# Altium PCB MainPCB.PcbDoc (part 3 of 3)
Units mm, origin at the board's own origin, x right, y up, seen from the top; angles counter-clockwise.
Board outline 200.18 x 193.98 mm, 4 copper layers (Top Layer, PWR, GND, Bottom Layer), stack 1.566 mm thick; 92 components, 81 nets, 391 pads, 267 vias.
Unrouted connection lines stored in the file: 114.
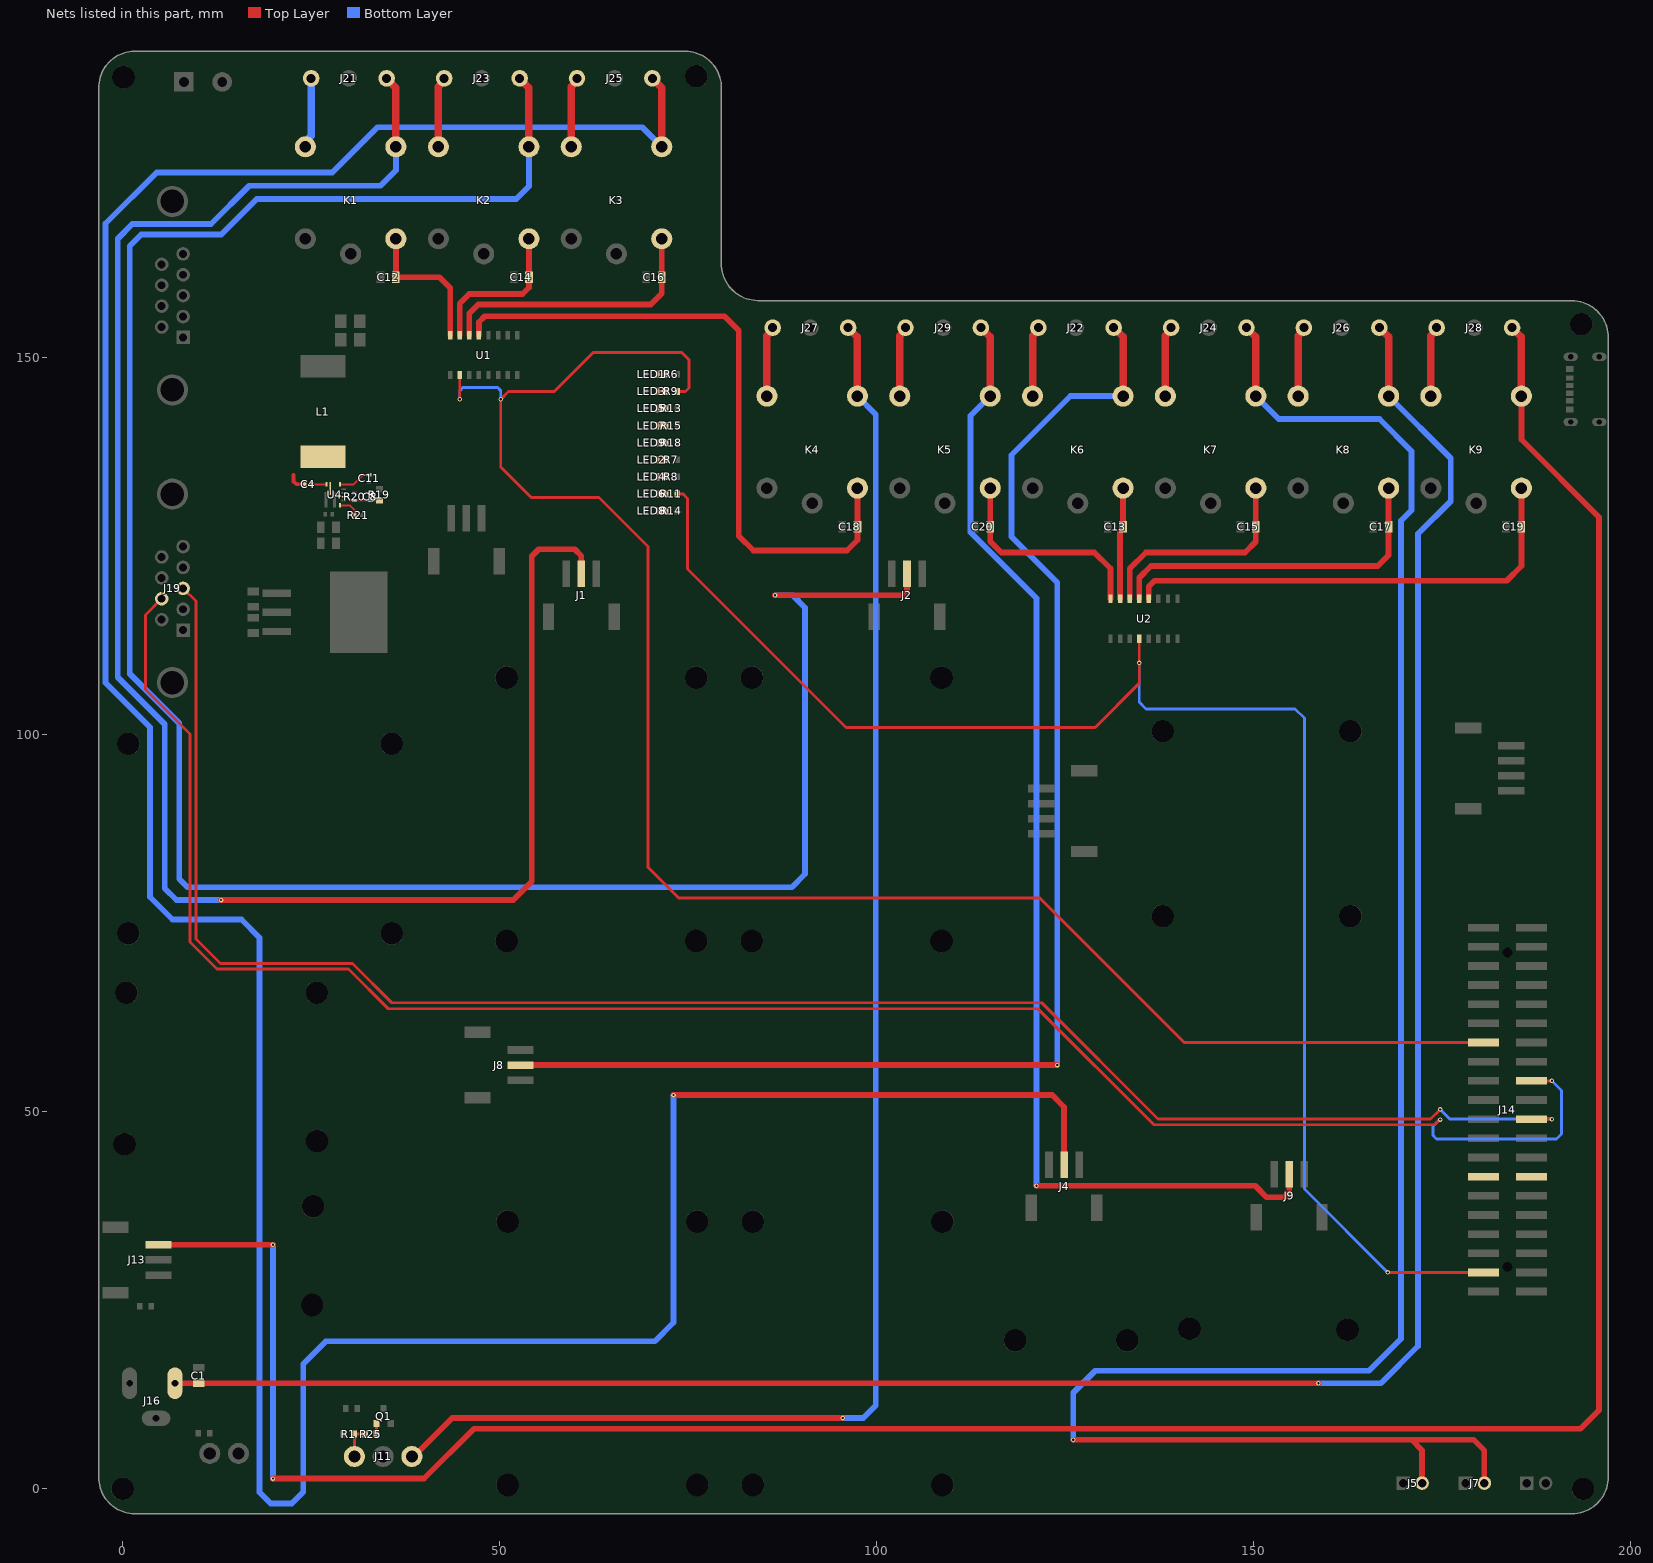
[diagram p4: the nets of this part, all layers, seen from the top]

## Via types
v1: diameter 0.6, hole 0.3, Top Layer to Bottom Layer, 267 vias

## Nets (pads, with @x,y where several pads share a name; then routed paths per layer and width w, separated by ;. In a path a pad name is that pad's centre, name@x,y a point inside that pad or via, vN(x,y) a via of type N, cw(c..) or ccw(c..) an arc to the next point about the centre after c; other vN are vias at no path point) (continued)
GPIO24: J14.18 J19.7 | length 255.3
  Top Layer w0.381: J19.7@5.184,118.027 5.156,118.027 3.023,115.893 3.023,106.007 8.948,100.081 8.948,72.508 12.524,68.933 29.968,68.933 35.23,63.671 121.357,63.671 136.751,48.276 173.972,48.276 174.667,48.971 v1(174.727,48.971) ; J14.18@186.842,54.102 v1(189.535,54.102)
  Bottom Layer w0.381: v1(174.727,48.971) 174.667,48.971 174.134,48.438 174.117,48.438 173.759,48.08 173.759,46.88 174.236,46.402 190.159,46.402 190.805,47.049 190.805,52.832 v1(189.535,54.102)
GPIO25: J14.22 J19.3 | length 240.7
  Top Layer w0.381: J19.3@8.024,119.412 9.722,117.714 9.722,72.926 12.972,69.676 30.48,69.676 35.697,64.459 121.889,64.459 137.315,49.032 173.442,49.032 v1(174.727,50.317) ; J14.22@186.842,49.022 v1(189.535,49.022)
  Bottom Layer w0.381: v1(174.727,50.317) 176.022,49.022 v1(189.535,49.022)
GPIO26: J14.37 R11.2 U2.4 | length 206.7
  Top Layer w0.381: R11.2@73.533,131.944 74.304,131.944 74.924,131.324 74.924,121.976 95.924,100.977 128.968,100.977 134.81,106.82 v1(134.81,109.526) U2.4@134.81,112.754 ; v1(167.767,28.702) J14.37@180.442,28.702
  Bottom Layer w0.381: v1(134.81,109.526) 134.81,104.331 135.712,103.429 155.476,103.429 156.706,102.199 156.706,39.763 v1(167.767,28.702)
GPIO27: J14.13 R9.2 U1.2 | length 240.5
  Top Layer w0.381: v1(44.708,144.475) U1.2@44.708,147.703 ; R9.2@73.533,145.525 74.63,145.525 75.09,145.986 75.09,149.725 74.143,150.673 62.412,150.673 57.247,145.508 51.17,145.508 v1(50.14,144.477) 50.14,135.518 54.197,131.461 63.173,131.461 69.661,124.972 69.661,82.427 73.745,78.343 121.61,78.343 140.771,59.182 J14.13@180.442,59.182
  Bottom Layer w0.381: v1(44.708,144.475) 44.708,145.622 45.11,146.025 49.735,146.025 49.737,146.027 50.14,145.624 v1(50.14,144.477)
ID_SC: J14.28
ID_SD: J14.27
NC1: J21.1 K1.3 | length 9.6
  Bottom Layer w1: K1.3@23.767,177.964 23.767,178.179 25.003,179.415 J21.1@25.003,187.038
NC2: J23.1 K2.3 | length 9.4
  Top Layer w1: K2.3@41.883,177.964 41.883,185.95 42.646,186.713 J23.1@42.646,187.038
NC3: J25.1 K3.3 | length 9.6
  Top Layer w1: K3.3@59.019,177.964 59.019,178.319 59.492,178.792 59.492,185.95 60.255,186.713 J25.1@60.255,187.038
NC4: J27.1 K4.3 | length 9.4
  Top Layer w1: K4.3@85.444,144.901 85.444,152.888 86.207,153.651 J27.1@86.207,153.976
NC5: J29.1 K5.3 | length 9.3
  Top Layer w1: K5.3@103.052,144.956 103.052,152.888 103.815,153.651 J29.1@103.815,153.976
NC6: J22.1 K6.3 | length 9.3
  Top Layer w1: K6.3@120.66,144.956 120.66,152.888 121.423,153.651 J22.1@121.423,153.976
NC7: J24.1 K7.3 | length 9.3
  Top Layer w1: K7.3@138.268,144.956 138.268,152.888 139.031,153.651 J24.1@139.031,153.976
NC8: J26.1 K8.3 | length 9.3
  Top Layer w1: K8.3@155.877,144.956 155.877,152.888 156.64,153.651 J26.1@156.64,153.976
NC9: J28.1 K9.3 | length 9.3
  Top Layer w1: K9.3@173.485,144.956 173.485,152.888 174.248,153.651 J28.1@174.248,153.976
NetC4_1: C4.1 U4.7 | length 1.9
  Top Layer w0.254: C4.1@25.086,133.209 U4.7@26.961,133.209
NetC4_2: C4.2 L1.1 U4.6 | length 2.5
  Top Layer w0.508: 22.656,134.442 22.656,133.593 23.04,133.209 C4.2@24.146,133.209
NetC8_1: C8.1 R19.1 R20.2 U4.2 | length 5
  Top Layer w0.254: U4.2@29.303,131.559 29.723,131.559 30.213,131.069 30.753,131.069 R20.2@30.763,131.059 R19.1@34.081,131.059
NetC11_2: C11.2 U4.5 | length 4.4
  Top Layer w0.254: U4.5@28.833,133.209 30.647,133.209 31.899,134.461 C11.2@32.715,134.461
NetJ11_1: J11.1 R1.1 R25.1 | length 4.4
  Top Layer w0.381: J11.1@30.734,4.293 R1.1@30.734,7.264 R25.1@32.134,7.264
NetLED1_1: LED1.1 R6.1 | length 1.1
  Top Layer w0.381: LED1.1@70.918,147.789 R6.1@72.009,147.789
NetLED2_1: LED2.1 R7.1 | length 1.1
  Top Layer w0.381: LED2.1@70.918,136.471 R7.1@72.009,136.471
NetLED3_1: LED3.1 R9.1 | length 1.1
  Top Layer w0.381: LED3.1@70.918,145.525 R9.1@72.009,145.525
NetLED4_1: LED4.1 R8.1 | length 1.1
  Top Layer w0.381: LED4.1@70.918,134.208 R8.1@72.009,134.208
NetLED5_1: LED5.1 R13.1 | length 1.1
  Top Layer w0.381: LED5.1@70.918,143.262 R13.1@72.009,143.262
NetLED6_1: LED6.1 R11.1 | length 1.1
  Top Layer w0.381: LED6.1@70.918,131.944 R11.1@72.009,131.944
NetLED7_1: LED7.1 R15.1 | length 1.1
  Top Layer w0.381: LED7.1@70.918,140.998 R15.1@72.009,140.998
NetLED8_1: LED8.1 R14.1 | length 1.1
  Top Layer w0.381: LED8.1@70.918,129.681 R14.1@72.009,129.681
NetLED9_1: LED9.1 R18.1 | length 1.1
  Top Layer w0.381: LED9.1@70.918,138.735 R18.1@72.009,138.735
NetQ1_1: Q1.1 R25.2 | length 1.4
  Top Layer w0.381: R25.2@33.658,7.264 Q1.1@33.658,8.661
NetR21_2: R21.2 U4.10 | length 2.9
  Top Layer w0.254: U4.10@28.833,130.409 30.14,130.409 30.763,129.786 R21.2@30.763,129.102
NO1: J1.2 J21.3 K1.2 | length 245.2
  Top Layer w0.762: v1(13.056,78.08) 51.809,78.08 54.254,80.525 54.254,109.069 54.254,123.664 55.188,124.598 59.951,124.598 60.833,123.716 J1.2@60.833,121.341
  Top Layer w1: J21.3@35.003,187.038 36.239,185.802 K1.2@36.239,177.964
  Bottom Layer w0.762: v1(13.056,78.08) 7.137,78.08 5.588,79.629 5.588,101.377 -0.65,107.615 -0.65,165.768 1.291,167.71 11.717,167.71 16.8,172.793 34.179,172.793 36.239,174.853 K1.2@36.239,177.964
NO2: J2.2 J23.3 K2.2 | length 301.9
  Top Layer w0.762: v1(86.512,118.491) 103.48,118.491 104.013,119.024 J2.2@104.013,121.341
  Top Layer w1: J23.3@52.646,187.038 53.882,185.802 K2.2@53.882,177.964
  Bottom Layer w0.762: K2.2@53.882,177.964 53.882,172.727 52.199,171.044 17.79,171.044 13.089,166.343 2.466,166.343 0.939,164.817 0.939,108.098 7.518,101.518 7.518,80.874 8.611,79.781 88.756,79.781 90.5,81.525 90.5,116.852 88.861,118.491 v1(86.512,118.491)
NO3: J4.2 J25.3 K3.2 | length 437.4
  Top Layer w0.762: v1(73.05,52.222) 123.266,52.222 124.841,50.648 J4.2@124.841,42.982
  Top Layer w1: J25.3@70.255,187.038 71.491,185.802 K3.2@71.491,177.964
  Bottom Layer w0.762: K3.2@71.491,177.964 68.897,180.558 33.81,180.558 27.808,174.555 4.52,174.555 -2.259,167.776 -2.259,106.894 3.638,100.998 3.638,78.481 6.63,75.489 15.762,75.489 18.161,73.09 18.161,-0.457 19.634,-1.93 22.43,-1.93 23.952,-0.409 23.952,16.561 26.949,19.558 70.561,19.558 73.05,22.047 v1(73.05,52.222)
NO4: J11.3 J27.3 K4.2 | length 208.8
  Top Layer w0.762: J11.3@38.354,4.293 38.603,4.293 43.708,9.398 v1(95.479,9.398)
  Top Layer w1: J27.3@96.207,153.976 97.443,152.74 K4.2@97.443,144.901
  Bottom Layer w0.762: v1(95.479,9.398) 98.218,9.398 99.873,11.053 99.873,142.471 K4.2@97.443,144.901
NO5: J9.2 J29.3 K5.2 | length 155.8
  Top Layer w0.762: v1(121.183,40.183) 150.193,40.183 151.702,38.674 154.038,38.674 154.686,39.322 J9.2@154.686,41.712
  Top Layer w1: J29.3@113.815,153.976 115.051,152.74 K5.2@115.051,144.901
  Bottom Layer w0.762: K5.2@115.051,144.901 112.435,142.286 112.435,126.857 121.183,118.109 v1(121.183,40.183)
NO6: J8.2 J22.3 K6.2 | length 182.2
  Top Layer w0.762: J8.2@52.761,56.197 v1(123.952,56.197)
  Top Layer w1: J22.3@131.423,153.976 132.659,152.74 K6.2@132.659,144.901
  Bottom Layer w0.762: v1(123.952,56.197) 123.952,120.167 117.856,126.263 117.856,137.077 125.681,144.902 K6.2@132.659,144.901
NO7: J5.2 J7.2 J24.3 K7.2 | length 270
  Top Layer w0.762: v1(126.06,6.528) 170.904,6.528 ; J5.2@172.319,0.762 172.319,5.113 170.904,6.528 ; J7.2@180.574,0.762 180.574,5.091 179.137,6.528 170.904,6.528
  Top Layer w1: J24.3@149.031,153.976 150.267,152.74 K7.2@150.267,144.901
  Bottom Layer w0.762: v1(126.06,6.528) 126.06,12.751 128.981,15.672 165.278,15.672 169.525,19.919 169.525,128.378 170.917,129.769 170.917,137.6 166.658,141.859 153.31,141.859 K7.2@150.267,144.901
NO8: C1.2 J16.1 J26.3 K8.2 | length 307.6
  Top Layer w0.762: J16.1@6.936,14.009 C1.2@10.084,14.009 ; C1.2@10.09,14.015 v1(158.566,14.015)
  Top Layer w1: J26.3@166.64,153.976 167.876,152.74 K8.2@167.876,144.901
  Bottom Layer w0.762: v1(158.566,14.015) 166.868,14.015 171.78,18.927 171.78,126.644 176.108,130.972 176.108,136.669 K8.2@167.876,144.901
NO9: J13.1 J28.3 K9.2 | length 374.1
  Top Layer w0.508: J13.1@4.755,32.353 J13.1@4.758,32.356
  Top Layer w0.762: J13.1@4.758,32.356 19.928,32.356 v1(19.931,32.36) ; v1(19.931,1.372) 39.98,1.372 46.58,7.972 193.316,7.972 195.78,10.436 195.78,128.836 185.484,139.133 K9.2@185.484,144.901
  Top Layer w1: J28.3@184.248,153.976 185.484,152.74 K9.2@185.484,144.901
  Bottom Layer w0.762: v1(19.931,1.372) v1(19.931,32.36)
"RELAY 1": C12.1 K1.1 U1.16 | length 19.1
  Top Layer w0.762: K1.1@36.239,165.764 C12.1@36.239,160.655 42.011,160.655 43.438,159.228 U1.16@43.438,152.983
"RELAY 2": C14.1 K2.1 U1.15 | length 20.7
  Top Layer w0.762: U1.15@44.708,152.983 44.708,157.179 45.968,158.44 53.035,158.44 53.883,159.287 C14.1@53.883,160.655 K2.1@53.883,165.764
"RELAY 3": C16.1 K3.1 U1.14 | length 36.7
  Top Layer w0.762: U1.14@45.978,152.983 45.978,155.855 47.172,157.05 70.03,157.05 71.491,158.511 C16.1@71.491,160.655 K3.1@71.491,165.764
"RELAY 4": C18.1 K4.1 U1.13 | length 88.5
  Top Layer w0.762: U1.13@47.248,152.983 47.248,154.715 48.031,155.499 79.809,155.499 81.716,153.592 81.716,126.361 83.642,124.435 96.063,124.435 97.443,125.815 C18.1@97.443,127.584 K4.1@97.443,132.701
"RELAY 5": C20.1 K5.1 U2.16 | length 28.5
  Top Layer w0.762: K5.1@115.051,132.701 C20.1@115.051,127.584 115.051,125.639 116.51,124.181 128.854,124.181 131,122.034 U2.16@131,118.034
"RELAY 6": C13.1 K6.1 U2.15 | length 14.8
  Top Layer w0.762: U2.15@132.27,118.034 132.27,126.941 132.66,127.33 C13.1@132.66,127.584 K6.1@132.66,132.701
"RELAY 7": C15.1 K7.1 U2.14 | length 29.3
  Top Layer w0.762: U2.14@133.541,118.034 133.541,122.034 135.687,124.181 148.844,124.181 150.268,125.604 C15.1@150.268,127.584 K7.1@150.268,132.701
"RELAY 8": C17.1 K8.1 U2.13 | length 46
  Top Layer w0.762: U2.13@134.81,118.034 134.81,120.817 136.37,122.377 166.446,122.377 167.876,123.807 C17.1@167.876,127.584 K8.1@167.876,132.701
"RELAY 9": C19.1 K9.1 U2.12 | length 62.5
  Top Layer w0.762: U2.12@136.081,118.034 136.081,119.672 136.83,120.421 183.535,120.421 185.484,122.371 C19.1@185.484,127.584 K9.1@185.484,132.701
pads on no net: J10.A5 J10.B5 J14. U1.5 U1.6 U1.7 U1.10 U1.11 U1.12 U2.6 U2.7 U2.10 U2.11 U4.1 U4.4

## Polygon pours and split planes (outlines as drawn)
GND on Top Layer "NONET_L-01_P-001" (solid, remove dead copper, pour order 12): -3.175,1.629 -3.175,185.698 cw(c1.703,185.774) 1.627,190.652 74.598,190.652 cw(c74.522,185.774) 79.4,185.698 79.4,162.53 ccw(c84.278,162.454) 84.202,157.576 192.198,157.576 cw(c192.122,152.698) 197,152.622 197,1.629 cw(c192.122,1.553) 192.198,-3.325 1.627,-3.325 cw(c1.703,1.553)
+24V on Top Layer "NONET_L-01_P-001" (solid, pour order 1): 10.033,164.338 9.093,165.278 -2.921,165.278 -2.921,185.572 cw(c1.93,185.573) 1.93,190.424 10.871,190.424 10.871,176.733 17.856,169.748 17.856,136.398 21.82,132.434 24.146,132.434 27.15,132.434 27.15,123.289 22.343,123.289 22.343,118.275 12.929,118.275 12.929,123.8 10.033,126.695
5V_EX on Top Layer "NONET_L-01_P-001" (solid, pour order 6): 29.667,145.39 19.634,145.39 19.634,175.362 29.667,175.362
GND on Top Layer "NONET_L-01_P-001" (solid, pour order 5): 33.033,132.715 32.233,132.715 32.233,131.571 30.208,131.571 29.845,131.934 29.003,131.934 29.003,132.27 30.253,132.27 31.752,133.769 33.033,133.769
NetC4_2 on Top Layer "NONET_L-01_P-001" (solid, pour order 4): 28.313,132.41 27.746,132.41 27.746,131.809 27.305,131.809 27.305,133.612 27.055,133.862 22.12,133.862 19.914,136.068 19.914,142.857 30.734,142.857 30.734,136.119 28.313,133.697
GND on Top Layer "NONET_L-01_P-001" (solid, pour order 3): 28.313,132.209 27.915,132.209 27.915,131.571 27.33,130.987 27.33,123.289 36.853,123.289 36.853,128.473 30.524,128.473 30.213,128.784 30.213,129.668 30.095,129.786 28.636,129.786 28.313,130.109
3V3 on PWR "NONET_L-01_P-001" (solid, pour order 11): -3.175,77.622 -3.175,-3.325 184.912,-3.325 184.912,77.622
5V_EX on PWR "NONET_L-01_P-001" (solid, pour order 8): 196.545,1.769 196.545,-3.325 185.598,-3.325 185.598,78.207 -2.787,78.207 -2.787,119.761 6.338,119.761 6.338,107.569 163.83,107.569 163.83,117.983 27.61,117.983 27.61,145.085 22.022,145.085 22.022,190.263 74.054,190.263 75.308,190.263 cw(c73.84,185.429) 78.892,185.428 78.892,161.747 ccw(c83.312,161.747) 83.312,157.328 191.653,157.328 cw(c191.882,152.664) 196.545,152.892 196.545,152.436
12V on PWR "NONET_L-01_P-001" (solid, pour order 2): 27.026,119.761 27.026,117.422 163.119,117.422 163.119,108.306 6.655,108.306 6.655,119.761
+24V on PWR "NONET_L-01_P-001" (solid, pour order 0): 21.438,144.348 27.026,144.348 27.026,120.066 -2.921,120.066 -2.921,185.572 cw(c1.93,185.573) 1.93,190.424 21.438,190.424
GND on Bottom Layer "NONET_L-01_P-001" (solid, remove dead copper, pour order 13): -3.175,1.629 -3.175,185.698 cw(c1.703,185.774) 1.627,190.652 74.598,190.652 cw(c74.522,185.774) 79.4,185.698 79.4,162.53 ccw(c84.278,162.454) 84.202,157.576 192.198,157.576 cw(c192.122,152.698) 197,152.622 197,1.629 cw(c192.122,1.553) 192.198,-3.325 1.627,-3.325 cw(c1.703,1.553)
5V_EX on Bottom Layer "NONET_L-01_P-001" (solid, pour order 10): 18.009,169.088 18.009,165.43 2.134,165.43 2.134,148.234 27.813,148.234 27.813,159.537 52.705,159.537 52.705,151.257 62.763,151.257 62.763,127.991 95.428,127.991 95.428,142.824 72.415,142.824 72.415,160.528 72.39,160.553 61.316,160.553 61.316,169.088
12V on Bottom Layer "NONET_L-01_P-001" (solid, pour order 9): 141.326,140.36 141.326,111.379 164.607,111.379 164.607,140.36
GND on GND "NONET_L-01_P-001" (solid, pour order 14): -3.175,1.629 -3.175,185.698 cw(c1.703,185.774) 1.627,190.652 74.598,190.652 cw(c74.522,185.774) 79.4,185.698 79.4,162.53 ccw(c84.278,162.454) 84.202,157.576 192.198,157.576 cw(c192.122,152.698) 197,152.622 197,1.629 cw(c192.122,1.553) 192.198,-3.325 1.627,-3.325 cw(c1.703,1.553)

## Other copper
Top Layer:
  rectangle net 5V_EX: 28.205,189.052 50.038,190.263
  rectangle net 5V_EX: 187.909,143.914 191.16,147.648
  rectangle net 5V_EX: 187.909,143.914 196.774,144.648
  rectangle net 5V_EX: 192.634,143.914 196.774,147.648
  rectangle net 5V_EX: 187.909,146.948 196.774,147.648
  rectangle net 5V_EX: 187.3,143.914 190.703,157.328
  rectangle net 5V_EX: 89.409,155.499 190.703,157.328
  rectangle net 5V_EX: 83.63,134.647 104.724,142.816
  rectangle net 5V_EX: 118.847,134.647 139.941,142.816
  rectangle net 3V3: 183.032,53.592 184.125,63.752
  rectangle net 3V3: 178.392,53.592 184.125,54.612
  rectangle net 3V3: 177.597,73.838 182.608,76.073
  rectangle net 12V: 142.265,135.238 164.033,142.816
  rectangle net 5V_EX: 19.634,167.716 61.164,175.388
  rectangle net 5V_EX: 28.205,159.893 34.715,161.417
  rectangle net 5V_EX: 22.437,163.805 32.394,167.716
  rectangle net 5V_EX: 40.081,163.805 50.038,172.568
  rectangle net 5V_EX: 45.849,159.893 52.359,161.417
  rectangle net 5V_EX: 57.69,159.884 61.164,172.568
  rectangle net 5V_EX: 57.69,159.884 69.967,161.408
  rectangle net 5V_EX: 171.683,126.822 175.157,134.391
  rectangle net 5V_EX: 171.683,126.822 183.96,128.346
  rectangle net 5V_EX: 154.075,126.822 157.549,134.391
  rectangle net 5V_EX: 154.075,126.822 166.352,128.346
  rectangle net 5V_EX: 136.467,126.822 139.941,142.816
  rectangle net 5V_EX: 136.467,126.822 148.744,128.346
  rectangle net 5V_EX: 101.25,126.822 113.527,128.346
  rectangle net 5V_EX: 101.25,126.822 104.724,142.816
  rectangle net 5V_EX: 118.859,126.822 131.136,129.083
  rectangle net 5V_EX: 118.847,126.822 128.815,142.816
  rectangle net 5V_EX: 83.63,126.822 93.599,142.816
  rectangle net 5V_EX: 83.642,126.822 95.919,129.083
  rectangle net 5V_EX: 52.038,152.261 53.96,154.129
  rectangle net GND: 52.038,147.013 53.96,148.849
  rectangle net 5V_EX: 139.601,117.474 141.859,119.64
  rectangle net GND: 139.601,110.947 141.859,113.314
  rectangle net 5V: 83.826,81.509 188.892,83.363
  region net 12V: 19.688,109.017 19.688,114.185 16.57,114.185 16.57,109.017
  region net 12V: 22.343,111.709 22.343,114.185 16.57,114.185 16.57,111.709
  rectangle net 5V_EX: 28.205,159.893 32.396,190.263
  rectangle net 5V_EX: 45.849,159.893 50.038,190.263
  rectangle net 3V3: 63.457,162.367 67.648,189.094
  rectangle net 5V_EX: 89.409,126.822 93.6,157.328
  rectangle net 3V3: 107.018,129.304 111.208,155.05
  rectangle net 5V_EX: 124.626,129.304 128.816,157.328
  rectangle net 12V: 142.234,129.304 146.424,155.032
  rectangle net 3V3: 177.45,129.304 181.641,155.076
  rectangle net 12V: 159.842,129.304 164.033,155.037
  rectangle net 5V: 184.792,71.372 188.892,83.363
  pour cut-out: 42.926,152.245 51.534,152.245 51.534,154.181 42.926,154.181
  pour cut-out: 21.895,175.595 21.895,180.162 27.102,180.162 27.102,175.595
  pour cut-out: 22.987,185.085 22.987,189.059 27.076,189.059 27.076,185.085
  pour cut-out: 96.138,8.338 90.907,8.338 90.907,10.273 96.138,10.273
  pour cut-out: 51.706,8.009 43.251,8.009 43.251,10.414 51.706,10.414
  pour cut-out: 159.207,12.389 153.588,12.389 153.588,14.656 159.207,14.656
  pour cut-out: 17.852,11.69 11.049,11.69 11.049,14.281 17.852,14.281
  pour cut-out: 176.316,53.442 176.316,62.116 178.251,62.116 178.251,53.442
  pour cut-out: 46.807,144.819 52.038,144.819 52.038,142.884 46.807,142.884
  pour cut-out: 42.926,148.44 51.534,148.44 51.534,146.505 42.926,146.505
  pour cut-out: 130.353,119.206 139.393,119.206 139.393,117.271 130.353,117.271
  pour cut-out: 130.507,111.582 139.116,111.581 139.116,113.517 130.507,113.517
  pour cut-out: 57.247,154.851 57.247,147.294 59.182,147.294 59.182,154.851
  pour cut-out: 74.117,148.848 70.465,148.848 70.465,128.978 74.117,128.978
  pour cut-out: 82.652,124.454 82.652,119.818 83.591,119.818 83.591,124.454
  pour cut-out: 60.884,154.864 60.884,153.34 81.068,153.34 81.068,154.864
  pour cut-out: 27.102,175.595 28.194,175.595 28.194,190.424 27.102,190.424
  pour cut-out: 28.029,190.424 28.029,189.059 32.396,189.059 32.396,190.424
  pour cut-out: 29.888,149.728 29.888,145.39 34.425,145.39 34.425,149.728
  pour cut-out: 17.856,145.39 17.856,142.857 34.747,142.857 34.747,145.39
  pour cut-out: 19.634,175.595 17.856,175.595 17.856,145.39 19.634,145.39
  pour cut-out: 29.007,134.239 29.007,133.737 29.235,133.509 30.387,133.509 31.786,134.908 34.747,134.908 34.747,142.857 30.886,142.857 30.886,136.135 29.003,134.252
  pour cut-out: 29.003,131.809 29.97,131.809 30.25,131.529 32.248,131.529 33.173,132.454 33.173,134.908 34.747,134.908 34.747,129.896 29.003,129.896
  pour cut-out: 28.626,133.509 28.626,130.109 29.003,130.109 29.003,133.509
PWR:
  rectangle net 5V: 81.885,78.207 90.856,83.947
  rectangle net 5V: 85.598,59.334 90.856,83.947
  pour cut-out: 37.407,122.562 27.61,122.562 27.61,123.781 37.407,123.781
  pour cut-out: 37.407,124.308 29.088,124.308 29.088,125.527 37.407,125.527
  pour cut-out: 37.407,126.054 29.088,126.054 29.088,127.273 37.407,127.273
  pour cut-out: 38.43,147.523 33.854,147.523 33.854,148.742 38.43,148.742
  pour cut-out: 38.43,149.962 32.33,149.962 32.33,151.181 38.43,151.181
  pour cut-out: 38.43,152.4 32.33,152.4 32.33,153.619 38.43,153.619
  pour cut-out: 38.43,154.838 32.33,154.838 32.33,156.058 38.43,156.058
  pour cut-out: 38.43,157.277 30.806,157.277 30.806,158.496 38.43,158.496
GND:
  pour cut-out: 9.682,183.159 3.177,183.159 3.177,190.259 9.682,190.259
  pour cut-out: 25.73,129.875 11.542,129.875 11.542,132.361 25.73,132.361
  pour cut-out: 162.941,112.243 143.023,112.243 143.023,113.462 162.941,113.462
  pour cut-out: 190.195,143.707 190.195,147.852 193.548,147.852 193.548,143.707
Bottom Layer:
  rectangle net +24V: 11.963,129.875 25.756,132.385
  rectangle net 5V_EX: 28.194,188.697 50.028,190.17
  rectangle net 5V_EX: 45.838,181.432 50.028,190.17
  rectangle net 5V_EX: 28.194,181.432 50.028,185.268
  rectangle net 5V_EX: 28.194,181.432 32.385,190.17
  rectangle net 5V_EX: 124.624,152.908 128.282,157.328
  rectangle net 5V_EX: 119.246,128.194 129.539,135.953
  rectangle net 5V: 85.598,59.334 90.856,61.9
  rectangle net 5V_EX: 187.503,142.951 194.716,148.901
  rectangle net 5V_EX: 185.91,146.939 190.271,157.328
  rectangle net 5V_EX: 187.503,142.951 190.304,157.328
  rectangle net 5V_EX: 89.408,155.493 190.304,157.328
  rectangle net 5V_EX: 89.408,152.908 93.066,157.328
  rectangle net 5V_EX: 136.271,129.667 140.233,140.36
  rectangle net 5V_EX: 125.093,136.042 140.233,140.36
  rectangle net 5V_EX: 125.093,128.194 129.539,140.36
  rectangle net 3V3: 177.6,61.087 184.374,64.919
  rectangle net 3V3: 177.6,61.087 182.608,155.092
  rectangle net 3V3: 106.425,128.956 110.921,155.076
  rectangle net 3V3: 73.609,147.041 182.601,152.298
  rectangle net 3V3: 62.865,181.534 78.892,185.445
  rectangle net 3V3: 62.865,181.534 67.361,190.144
  rectangle net 3V3: 73.609,147.879 78.892,185.445
  rectangle net 3V3: 62.332,168.732 78.892,175.743
  rectangle net 3V3: 62.332,161.925 68.682,175.743
  rectangle net 12V: 158.883,128.019 164.607,140.36
  rectangle net 12V: 141.326,128.019 147.216,140.36
  rectangle net 12V: 12.223,108.46 19.932,111.044
  rectangle net 12V: 12.076,108.46 14.974,117.964
  rectangle net 12V: 6.985,115.291 14.974,117.964
  rectangle net 5V: 9.55,81.509 86.462,83.333
  rectangle net 5V: 9.55,81.509 11.568,114.833
  rectangle net 5V: 6.997,110.642 11.568,114.833
  pour cut-out: 13.716,79.159 13.716,75.12 12.929,75.12 12.929,79.159
  pour cut-out: 2.007,163.174 2.007,163.855 7.954,169.803 11.989,169.803 21.971,169.803 21.971,176.276 -2.718,176.276 -2.718,163.174
  pour cut-out: 21.971,169.803 21.971,179.857 62.211,179.857 62.211,169.803
  pour cut-out: 182.815,142.76 187.274,142.76 187.274,145.52 182.815,145.52
  pour cut-out: 129.567,128.245 141.118,128.245 141.118,134.163 129.567,134.163
  pour cut-out: 111.128,128.194 119.039,128.194 119.039,146.71 111.128,146.71
  pour cut-out: 164.846,127.965 177.444,127.965 177.444,133.883 164.846,133.883
  pour cut-out: 95.605,127.965 106.218,127.965 106.218,133.883 95.605,133.883
  pour cut-out: 2.007,176.327 -2.718,176.327 -2.718,106.718 2.007,106.718
  pour cut-out: 72.612,143.031 72.612,146.761 79.28,146.761 79.28,143.031
  pour cut-out: 21.996,176.111 21.996,190.291 22.826,190.291 22.826,176.111

## Silkscreen, mask and mechanical layers (free items; w line width, h text height)
Top Overlay:
  lines w0.127: 31.169,130.741 31.169,130.367 31.524,130.012 34.162,130.012 34.162,129.533 ; 32.944,130.544 32.944,130.309 34.931,130.309 35.636,129.604 ; 34.081,129.761 33.934,129.761 34.162,129.533 ; 34.242,129.761 34.389,129.761 34.162,129.533 ; 35.475,129.761 35.318,129.604 35.636,129.604 ; 35.48,129.766 35.636,129.922 35.636,129.604
  lines w0.254: -2.839,70.233 -2.839,102.233 39.161,102.233 39.161,70.233 -2.839,70.233 ; -2.794,20.894 -2.794,40.894 35.206,40.894 35.206,20.894 -2.794,20.894 ; -2.794,42.164 29.21,42.164 29.21,69.215 -2.794,69.215 -2.794,42.164 ; 47.5,69.043 47.5,111.043 79.5,111.043 79.5,69.043 47.5,69.043 ; 47.627,-3.093 47.627,38.907 79.627,38.907 79.627,-3.093 47.627,-3.093 ; 80.012,69.043 80.012,111.043 112.012,111.043 112.012,69.043 80.012,69.043 ; 80.139,-3.093 80.139,38.907 112.139,38.907 112.139,-3.093 80.139,-3.093 ; 114.73,-3.03 114.73,30.97 136.73,30.97 136.73,-3.03 114.73,-3.03 ; 134.368,72.265 134.368,104.265 166.368,104.265 166.368,72.265 134.368,72.265 ; 137.892,-3.205 137.892,24.795 165.892,24.795 165.892,-3.205 137.892,-3.205
  text "+24V" at 6.295,180.907 h1
  text "GND" at 11.875,180.907 h1
  text "RELAY 1" at 62.86,147.128 h1.4
  text "RELAY 2" at 62.86,144.865 h1.4
  text "RELAY 3" at 62.86,142.601 h1.4
  text "USB" at 190.329,140.698 h1.5 r90
  text "RELAY 4" at 62.86,140.338 h1.4
  text "RELAY 5" at 62.86,138.074 h1.4
  text "RELAY 6" at 62.86,135.811 h1.4
  text "RELAY 7" at 62.86,133.547 h1.4
  text "RELAY 8" at 62.86,131.284 h1.4
  text "EXTRA SENSOR" at 40.493,131.032 h1.5
  text "RELAY 9" at 62.86,129.02 h1.4
  text "ISOLATOR" at 55.733,123.463 h1.5
  text "ISOLATOR" at 98.913,123.463 h1.5
  text "MAIN" at 196.139,114.452 h3 r90
  text "ISOLATOR" at 55.882,106.299 h2.03
  text "ISOLATOR" at 88.394,106.172 h2.03
  text "I2C" at 186.658,100.652 h1.5 r270
  text "ADS1115" at 144.105,98.933 h2.03
  text "Extra Sensor" at 15.19,97.744 h2.03 r270
  text "ADC" at 119.437,84.768 h1.5 r90
  text "CURRENT SENSOR" at 15.422,67.986 h1.8 r270
  text "CURRENT SENSOR" at 55.162,61.297 h1.5 r270
  text "Probe In" at -1.897,58.166 h1 r270
  text "DS TEMP" at 119.741,45.155 h1.5
  text "LEVEL SENSOR" at 149.586,43.91 h1.5
  text "NO9 GPIO11 GND" at 7.29,36.957 h1 r270
  text "DHT22" at 15.19,35.052 h2.03 r270
  text "DS TEMP" at 118.959,9.271 h2.03
  text "LEVEL SENSOR" at 140.043,8.636 h2.03
  text "pH" at 62.306,-1.837 h2.03
  text "EC" at 94.446,-2.413 h2.03
Bottom Overlay:
  text "NC1" at 23.918,190.017 h1.02 r180
  text "5V-EX" at 27.633,190.017 h1.02 r180
  text "NO1" at 33.918,190.017 h1.02 r180
  text "NC2" at 41.392,190.017 h1.02 r180
  text "5V-EX" at 45.276,190.017 h1.02 r180
  text "NO2" at 51.392,190.017 h1.02 r180
  text "NC3" at 59.001,190.017 h1.02 r180
  text "3V3" at 63.9,190.017 h1.02 r180
  text "NO3" at 69.001,190.017 h1.02 r180
  text "+24V" at 6.295,183.126 h1 r180
  text "GND" at 11.875,183.126 h1 r180
  text "NC4" at 84.953,156.955 h1.02 r180
  text "NO4" at 94.953,156.955 h1.02 r180
  text "NC5" at 102.561,156.955 h1.02 r180
  text "3V3" at 107.461,156.955 h1.02 r180
  text "NO5" at 112.561,156.955 h1.02 r180
  text "NC6" at 120.169,156.955 h1.02 r180
  text "NO6" at 130.169,156.955 h1.02 r180
  text "NC7" at 137.777,156.955 h1.02 r180
  text "12V" at 142.762,156.955 h1.02 r180
  text "NO7" at 147.777,156.955 h1.02 r180
  text "NC8" at 155.386,156.955 h1.02 r180
  text "12V" at 160.37,156.955 h1.02 r180
  text "NO8" at 165.386,156.955 h1.02 r180
  text "NC9" at 172.994,156.955 h1.02 r180
  text "3V3" at 177.894,156.955 h1.02 r180
  text "NO9" at 182.994,156.955 h1.02 r180
  text "5V-EX" at 88.837,151.899 h1.02 r180
  text "5V-EX" at 124.053,151.899 h1.02 r180
  text "Rev-v1.1" at 107.409,4.317 h3
Board Outline:
  the board outline again, w0.254
Fabrication:
  drawing of 295 lines, arcs and shapes, not listed
  text "Layer" at 276.178,211.48 h1.52
  text "Name" at 286.59,211.48 h1.52
  text "Material" at 310.205,211.48 h1.52
  text "Thickness" at 332.043,211.48 h1.52
  text "Constant" at 348.549,211.48 h1.52
  text "Board Layer Stack" at 363.024,211.48 h1.52
  text "Top Overlay" at 286.59,208.432 h1.52
  text "Top Solder" at 286.59,205.384 h1.52
  text "Solder Resist" at 310.205,205.384 h1.52
  text "0.013mm" at 332.043,205.384 h1.52
  text "3.5" at 348.549,205.384 h1.52
  text "1" at 276.178,202.336 h1.52
  text "Top Layer" at 286.59,202.336 h1.52
  text "0.035mm" at 332.043,202.336 h1.52
  text "PrePreg 1" at 286.59,199.288 h1.52
  text "PP-006" at 310.205,199.288 h1.52
  text "0.203mm" at 332.043,199.288 h1.52
  text "4.1" at 348.549,199.288 h1.52
  text "2" at 276.178,196.24 h1.52
  text "PWR" at 286.59,196.24 h1.52
  text "CF-004" at 310.205,196.24 h1.52
  text "0.030mm" at 332.043,196.24 h1.52
  text "Core" at 286.59,193.192 h1.52
  text "FR-4" at 310.205,193.192 h1.52
  text "1.030mm" at 332.043,193.192 h1.52
  text "4.8" at 348.549,193.192 h1.52
  text "3" at 276.178,190.144 h1.52
  text "GND" at 286.59,190.144 h1.52
  text "CF-004" at 310.205,190.144 h1.52
  text "0.030mm" at 332.043,190.144 h1.52
  text "PrePreg 2" at 286.59,187.096 h1.52
  text "PP-006" at 310.205,187.096 h1.52
  text "0.203mm" at 332.043,187.096 h1.52
  text "4.1" at 348.549,187.096 h1.52
  text "4" at 276.178,184.048 h1.52
  text "Bottom Layer" at 286.59,184.048 h1.52
  text "0.035mm" at 332.043,184.048 h1.52
  text "Bottom Solder" at 286.59,181 h1.52
  text "Solder Resist" at 310.205,181 h1.52
  text "0.013mm" at 332.043,181 h1.52
  text "3.5" at 348.549,181 h1.52
  text "Bottom Overlay" at 286.59,177.952 h1.52
  text "Total board thickness:" at 276.178,174.904 h1.52
  text "1.591mm" at 332.043,174.904 h1.52
Drill Drawing:
  drawing of 159 lines, arcs and shapes, not listed
  text "Symbol" at 1.003,281.558 h1.83
  text "Count" at 13.853,281.558 h1.83
  text "Hole Size" at 29.089,281.558 h1.83
  text "Plated" at 58.036,281.558 h1.83
  text "Hole Type" at 70.885,281.558 h1.83
  text "Drill Layer Pair" at 89.524,281.558 h1.83
  text "Via/Pad" at 127.612,281.558 h1.83
  text "Pad Shape" at 142.595,281.558 h1.83
  text "Template" at 161.538,281.558 h1.83
  text "Description" at 236.698,281.558 h1.83
  text "Hole Tolerance (+)" at 258.384,281.558 h1.83
  text "Hole Tolerance (-)" at 292.258,281.558 h1.83
  text "Hole Length" at 326.131,281.558 h1.83
  text "Routed Path Length" at 355.333,281.558 h1.83
  text "1" at 13.853,277.748 h1.52
  text "35.43mil (0.900mm)" at 29.089,277.748 h1.52
  text "PTH" at 58.036,277.748 h1.52
  text "Slot" at 70.885,277.748 h1.52
  text "Top Layer - Bottom Layer" at 89.524,277.748 h1.52
  text "Pad" at 127.612,277.748 h1.52
  text "Rounded" at 142.595,277.748 h1.52
  text "r200_380h90_260r100o0_0m205_385mx205_385p200_380" at 161.538,277.748 h1.52
  text "102.35mil (2.600mm)" at 326.131,277.748 h1.52
  text "66.92mil (1.700mm)" at 355.333,277.748 h1.52
  text "1" at 13.853,273.938 h1.52
  text "51.18mil (1.300mm)" at 29.089,273.938 h1.52
  text "PTH" at 58.036,273.938 h1.52
  text "Round" at 70.885,273.938 h1.52
  text "Top Layer - Bottom Layer" at 89.524,273.938 h1.52
  text "Pad" at 127.612,273.938 h1.52
  text "Rounded" at 142.595,273.938 h1.52
  text "c260h130" at 161.538,273.938 h1.52
  text "-" at 326.131,273.938 h1.52
  text "-" at 355.333,273.938 h1.52
  text "1" at 13.853,270.128 h1.52
  text "51.97mil (1.320mm)" at 29.089,270.128 h1.52
  text "PTH" at 58.036,270.128 h1.52
  text "Round" at 70.885,270.128 h1.52
  text "Top Layer - Bottom Layer" at 89.524,270.128 h1.52
  text "Pad" at 127.612,270.128 h1.52
  text "Rectangle" at 142.595,270.128 h1.52
  text "s260h132" at 161.538,270.128 h1.52
  text "-" at 326.131,270.128 h1.52
  text "-" at 355.333,270.128 h1.52
  text "2" at 13.853,266.318 h1.52
  text "35.43mil (0.900mm)" at 29.089,266.318 h1.52
  text "PTH" at 58.036,266.318 h1.52
  text "Slot" at 70.885,266.318 h1.52
  text "Top Layer - Bottom Layer" at 89.524,266.318 h1.52
  text "Pad" at 127.612,266.318 h1.52
  text "Rounded" at 142.595,266.318 h1.52
  text "(Mixed)" at 161.538,266.318 h1.52
  text "122.05mil (3.100mm)" at 326.131,266.318 h1.52
  text "86.62mil (2.200mm)" at 355.333,266.318 h1.52
  text "2" at 13.853,262.508 h1.52
  text "51.18mil (1.300mm)" at 29.089,262.508 h1.52
  text "NPTH" at 58.036,262.508 h1.52
  text "Round" at 70.885,262.508 h1.52
  text "Top Layer - Bottom Layer" at 89.524,262.508 h1.52
  text "Pad" at 127.612,262.508 h1.52
  text "Rounded" at 142.595,262.508 h1.52
  text "c0hn130p-1" at 161.538,262.508 h1.52
  text "-" at 326.131,262.508 h1.52
  text "-" at 355.333,262.508 h1.52
  text "4" at 13.853,258.698 h1.52
  text "27.56mil (0.700mm)" at 29.089,258.698 h1.52
  text "PTH" at 58.036,258.698 h1.52
  text "Slot" at 70.885,258.698 h1.52
  text "Top Layer - Bottom Layer" at 89.524,258.698 h1.52
  text "Pad" at 127.612,258.698 h1.52
  text "Rounded" at 142.595,258.698 h1.52
  text "r110_190h70_150r100m115_195mx115_195p110_190" at 161.538,258.698 h1.52
  text "59.06mil (1.500mm)" at 326.131,258.698 h1.52
  text "31.50mil (0.800mm)" at 355.333,258.698 h1.52
  text "4" at 13.853,254.888 h1.52
  text "122.05mil (3.100mm)" at 29.089,254.888 h1.52
  text "PTH" at 58.036,254.888 h1.52
  text "Round" at 70.885,254.888 h1.52
  text "Top Layer - Bottom Layer" at 89.524,254.888 h1.52
  text "Pad" at 127.612,254.888 h1.52
  text "Rounded" at 142.595,254.888 h1.52
  text "c412h310" at 161.538,254.888 h1.52
  text "-" at 326.131,254.888 h1.52
  text "-" at 355.333,254.888 h1.52
  text "5" at 13.853,251.078 h1.52
  text "62.99mil (1.600mm)" at 29.089,251.078 h1.52
  text "PTH" at 58.036,251.078 h1.52
  text "Round" at 70.885,251.078 h1.52
  text "Top Layer - Bottom Layer" at 89.524,251.078 h1.52
  text "Pad" at 127.612,251.078 h1.52
  text "Rounded" at 142.595,251.078 h1.52
  text "c280h160m285mx285p280" at 161.538,251.078 h1.52
  text "-" at 326.131,251.078 h1.52
  text "-" at 355.333,251.078 h1.52
  text "6" at 13.853,247.268 h1.52
  text "43.31mil (1.100mm)" at 29.089,247.268 h1.52
  text "PTH" at 58.036,247.268 h1.52
  text "Round" at 70.885,247.268 h1.52
  text "Top Layer - Bottom Layer" at 89.524,247.268 h1.52
  text "Pad" at 127.612,247.268 h1.52
  text "(Mixed)" at 142.595,247.268 h1.52
  text "(Mixed)" at 161.538,247.268 h1.52
  text "-" at 326.131,247.268 h1.52
  text "-" at 355.333,247.268 h1.52
  text "18" at 13.853,243.458 h1.52
  text "41.34mil (1.050mm)" at 29.089,243.458 h1.52
  text "PTH" at 58.036,243.458 h1.52
  text "Round" at 70.885,243.458 h1.52
  text "Top Layer - Bottom Layer" at 89.524,243.458 h1.52
  text "Pad" at 127.612,243.458 h1.52
  text "Rounded" at 142.595,243.458 h1.52
  text "(Mixed)" at 161.538,243.458 h1.52
  text "-" at 326.131,243.458 h1.52
  text "-" at 355.333,243.458 h1.52
  text "27" at 13.853,239.648 h1.52
  text "47.24mil (1.200mm)" at 29.089,239.648 h1.52
  text "PTH" at 58.036,239.648 h1.52
  text "Round" at 70.885,239.648 h1.52
  text "Top Layer - Bottom Layer" at 89.524,239.648 h1.52
  text "Pad" at 127.612,239.648 h1.52
  text "Rounded" at 142.595,239.648 h1.52
  text "c220h120m225mx225p220" at 161.538,239.648 h1.52
  text "-" at 326.131,239.648 h1.52
  text "-" at 355.333,239.648 h1.52
  text "39" at 13.853,235.838 h1.52
  text "118.11mil (3.000mm)" at 29.089,235.838 h1.52
  text "NPTH" at 58.036,235.838 h1.52
  text "Round" at 70.885,235.838 h1.52
  text "Top Layer - Bottom Layer" at 89.524,235.838 h1.52
  text "Pad" at 127.612,235.838 h1.52
  text "Rounded" at 142.595,235.838 h1.52
  text "c300hn300p300" at 161.538,235.838 h1.52
  text "-" at 326.131,235.838 h1.52
  text "-" at 355.333,235.838 h1.52
  text "45" at 13.853,232.028 h1.52
  text "60.00mil (1.524mm)" at 29.089,232.028 h1.52
  text "PTH" at 58.036,232.028 h1.52
  text "Round" at 70.885,232.028 h1.52
  text "Top Layer - Bottom Layer" at 89.524,232.028 h1.52
  text "Pad" at 127.612,232.028 h1.52
  text "Rounded" at 142.595,232.028 h1.52
  text "(Mixed)" at 161.538,232.028 h1.52
  text "-" at 326.131,232.028 h1.52
  text "-" at 355.333,232.028 h1.52
  text "267" at 13.853,228.218 h1.52
  text "11.81mil (0.300mm)" at 29.089,228.218 h1.52
  text "PTH" at 58.036,228.218 h1.52
  text "Round" at 70.885,228.218 h1.52
  text "Top Layer - Bottom Layer" at 89.524,228.218 h1.52
  text "Via" at 127.612,228.218 h1.52
  text "Rounded" at 142.595,228.218 h1.52
  text "v60h30" at 161.538,228.218 h1.52
  text "-" at 326.131,228.218 h1.52
  text "-" at 355.333,228.218 h1.52
  text "422 Total" at 13.853,224.408 h1.52
  text "Slot definitions :" at 1.003,220.725 h1.52
  text "Routed Path Length" at 27.234,220.725 h1.52
  text "= Calculated from tool start centre position to tool end centre position." at 55.241,220.725 h1.52
  text "Hole Length" at 27.234,218.186 h1.52
  text "= Routed Path Length + Tool Size = Slot length as defined in the PCB layout" at 44.831,218.186 h1.52

## Dimensions
192.198,157.576 to 192.198,-3.325 on Dimensions
74.598,190.652 to 84.202,157.576 on Dimensions
1.627,-3.325 to 1.627,190.652 on Dimensions
-3.175,185.698 to 79.4,185.698 on Dimensions
197,152.622 to -3.175,185.698 on Dimensions

## Text inside footprints (layer, text, board x,y; h text height)
J1: Top Overlay "PCB Edge" at 58.604,114.353 h1.2
J2: Top Overlay "PCB Edge" at 101.784,114.353 h1.2
J3: Top Overlay "PCB Edge" at 43.364,121.719 h1.2
J4: Top Overlay "PCB Edge" at 122.612,35.994 h1.2
J8: Top Overlay "PCB Edge" at 45.773,58.426 h1.2 r270
J9: Top Overlay "PCB Edge" at 152.457,34.724 h1.2
J13: Top Overlay "PCB Edge" at -2.233,32.582 h1.2 r270
J17: Top Overlay "1" at 7.515,151.266 h1 r270
J18: Top Overlay "PCB Edge" at 177.162,98.323 h1.2 r270
J19: Top Overlay "1" at 7.515,112.456 h1 r270
J20: Top Overlay "PCB Edge" at 128.781,87.097 h1.2 r90
K1: Top Overlay "1" at 36.798,163.732 h1 r90
K2: Top Overlay "1" at 54.442,163.732 h1 r90
K3: Top Overlay "1" at 72.05,163.732 h1 r90
K4: Top Overlay "1" at 98.002,130.669 h1 r90
K5: Top Overlay "1" at 115.61,130.669 h1 r90
K6: Top Overlay "1" at 133.218,130.669 h1 r90
K7: Top Overlay "1" at 150.827,130.669 h1 r90
K8: Top Overlay "1" at 168.435,130.669 h1 r90
K9: Top Overlay "1" at 186.043,130.669 h1 r90